# Altium PCB Membrane_Board_Latest.PcbDoc (part 3 of 4)
Units mil, origin at the board's own origin, x right, y up, seen from the top; angles counter-clockwise.
Board outline 11929.13 x 4962.8 mil, 2 copper layers (Top Layer, Bottom Layer), stack 59 mil thick; 247 components, 169 nets, 1256 pads, 657 vias.
Unrouted connection lines stored in the file: 293.
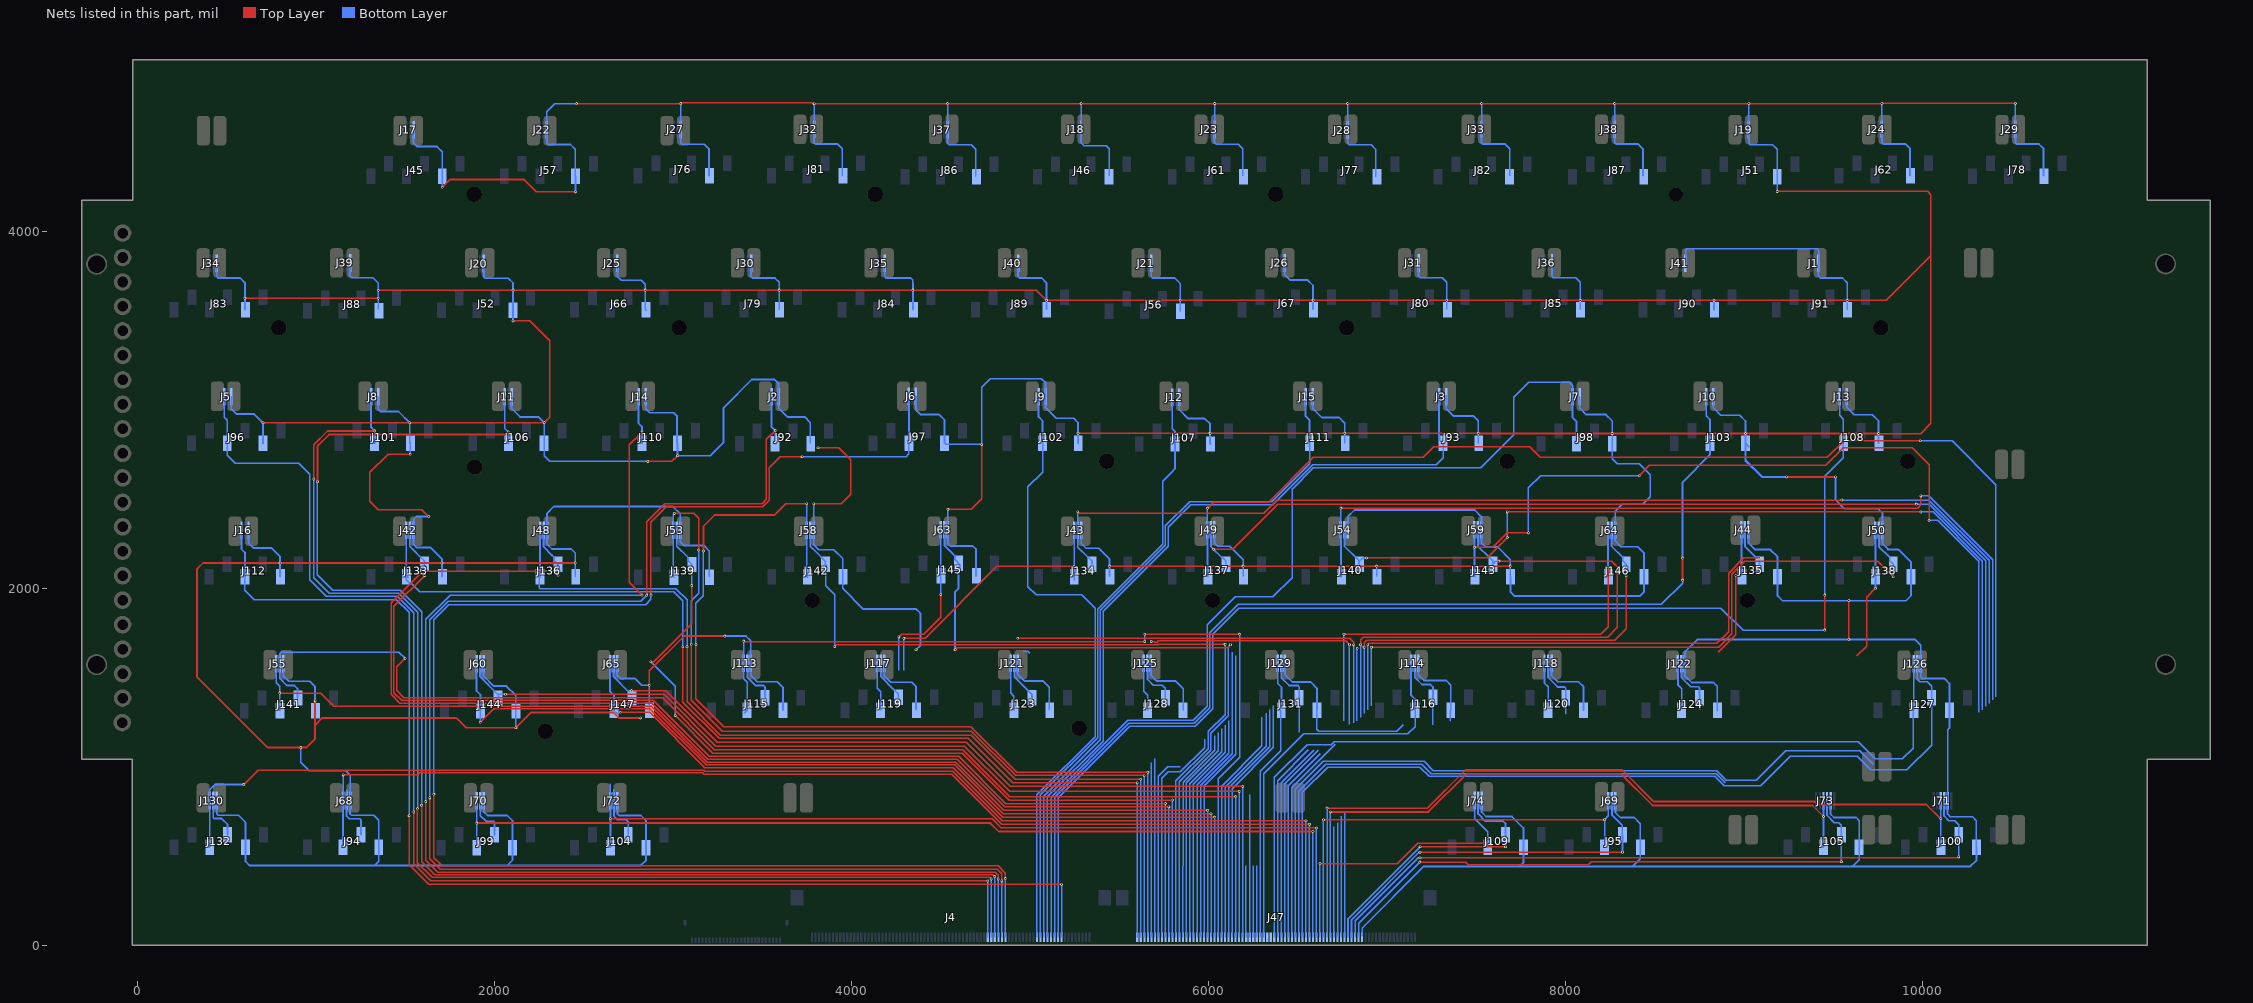
[diagram p3: the nets of this part, all layers, seen from the top]

## Via types
v1: diameter 15.75, hole 7.87, Top Layer to Bottom Layer, tented both sides, 655 vias
v2: diameter 23.62, hole 11.81, Top Layer to Bottom Layer, 2 vias

## Nets (pads, with @x,y where several pads share a name; then routed paths per layer and width w, separated by ;. In a path a pad name is that pad's centre, name@x,y a point inside that pad or via, vN(x,y) a via of type N, cw(c..) or ccw(c..) an arc to the next point about the centre after c; other vN are vias at no path point) (continued)
I2C5.SDA_27: J4.51 J5.3 J96.3 | length 7070.1
  Top Layer w8: v1@1546.23,746.9 1546.23,456.77 1643,360 v1@4761.66,360
  Bottom Layer w8: J96.3@501.73,2811.38 501.73,2744.51 546.79,2699.46 902.79,2699.46 963.79,2638.46 963.79,2047.46 1055.79,1955.46 1453.79,1955.46 1546.79,1862.46 1546.79,746.46 v1(1546.73,746.4) ; J4.51@4763,44.5 v1(4763,360)
  Bottom Layer w10: J5.3@484.73,3073.75 484.73,2958.27 501.73,2941.27 J96.3@501.73,2811.38
I2C5.SDA_28: J4.52 J8.3 J101.3 | length 7034.8
  Top Layer w8: v1@1567.29,765.96 1567.29,461.71 1649,380 4774,380 v1(4783,371)
  Top Layer w10: v1(986.79,2612.46) 986.79,2804.79 1063.46,2881.46 v1(1327.79,2881.46)
  Bottom Layer w8: v1(986.79,2612.46) 986.79,2059.46 1073.79,1972.46 1461.79,1972.46 1567.79,1866.46 v1(1567.79,765.46) ; J4.52@4782.73,44.46 v1@4782.73,371
  Bottom Layer w10: J8.3@1307.79,3073.75 1307.79,2901.46 v1(1327.79,2881.46) J101.3@1327.79,2811.38
I2C5.SDA_29: J4.53 J11.3 J106.3 | length 7748.3
  Top Layer w8: v1@1590.23,785.02 1590.23,468.77 1664,395 4791.16,395 v1(4802,384.16)
  Top Layer w10: v1(1006.79,2596.46) 1006.79,2795.79 1072.46,2861.46 2061.79,2861.46 v1(2075.79,2875.46)
  Bottom Layer w8: v1(1006.79,2596.46) 1006.79,2074.46 1092.79,1988.46 1470.79,1988.46 1590.79,1868.46 1590.79,784.58 v1(1590.73,784.52) ; J4.53@4802,44.87 v1(4802,384.16)
  Bottom Layer w10: J11.3@2056,3071.84 2056,2895.25 v1(2075.79,2875.46) 2075.79,2813.01 J106.3@2077.42,2811.38
I2C5.SDA_30: J4.54 J14.3 J110.3 | length 7481.8
  Top Layer w8: v1@1613.29,804.96 1613.29,476.71 1680,410 4805,410 4821.78,393.22 v1(4821.78,371.22) ; v1@2825.79,1962.15 2755,2032.94 2755,2804.67 v1(2825.79,2875.46)
  Bottom Layer w8: v1(1613.79,804.46) 1613.79,1825.46 1749.79,1961.46 2825.1,1961.46 v1(2825.44,1961.8) ; J4.54@4821.78,44.78 v1(4821.78,371.22)
  Bottom Layer w10: J14.3@2806.1,3073.75 2806.1,2924.9 2825.1,2905.9 ; J110.3@2825.1,2811.38 2825.1,2905.9 ; v1(2825.79,2875.46) 2825.79,2905.21 2825.1,2905.9
I2C5.SDA_31: J2.3 J4.55 J92.3 | length 8017
  Top Layer w8: v1@1636.29,825.96 1636.29,484.71 1696,425 4816.22,425 4841.78,399.44 v1(4841.78,360.22) ; v1(2851.79,1961.46) 2851.79,2373.79 2952.46,2474.46 3499.25,2474.46 3523,2498.21 3523,2834.67 v1(3571.79,2883.46)
  Bottom Layer w8: v1(1636.79,825.46) 1636.79,1824.71 1739.54,1927.46 2817.79,1927.46 v1(2851.79,1961.46) ; J4.55@4841.78,44.46 v1(4841.78,360.22)
  Bottom Layer w10: J2.3@3552,3070.76 3552,2903.25 v1(3571.79,2883.46) ; J92.3@3571.1,2810.38 v1@3571.1,2883.46
I2C5.SDA_32: J4.56 J6.3 J97.3 | length 8658.8
  Top Layer w8: v1(1659.79,845.46) 1659.79,490.21 1706,444 4821,444 4861,404 v1(4861,373) ; v1(2875.79,1961.46) 2875.79,2370.79 2962,2457 3503,2457 3538,2492 3538,2675.67 3599.79,2737.46 v1(3722.79,2737.46)
  Bottom Layer w8: v1(1659.79,845.46) 1659.79,1824.46 1743.79,1908.46 2846.46,1908.46 2875.79,1937.79 v1(2875.79,1961.46) ; v1(3722.79,2737.46) 4304.93,2737.46 4321.1,2753.63 J97.3@4321.1,2812.38 ; J4.56@4861,44.93 v1(4861,373)
  Bottom Layer w10: J97.3@4321.1,2812.38 J6.3@4321.1,3074.75
I2C5.SDA_33: J4.65 J9.3 J102.3 | length 3513.2
  Bottom Layer w8: J4.65@5038.63,44.46 5038.63,843.3 5364,1168.67 5364,1887.25 5288.79,1962.46 5033.79,1962.46 4986.79,2009.46 4986.79,2568.46 5069.79,2651.46 J102.3@5069.79,2811.38
  Bottom Layer w10: J9.3@5047.79,3073.75 5047.79,2960.21 5069.79,2938.21 J102.3@5069.79,2811.38
I2C5.SDA_34: J4.66 J12.3 J107.3 | length 3344.6
  Bottom Layer w8: J4.66@5058.32,44.46 5058.32,453 5058.32,841.77 5379,1162.46 5379,1883.64 5743,2247.64 5743,2600.67 5799.29,2656.96 ; J12.3@5796.79,3070.75 5796.79,2894 5811.79,2879
  Bottom Layer w10: 5799.29,2656.96 5811.79,2669.46 J107.3@5811.79,2808.38 5811.79,2879
I2C5.SDA_35: J4.67 J15.3 J111.3 | length 3924.9
  Bottom Layer w8: J4.67@5078,44.46 5078,453 5078,835.67 5394,1151.67 5394,1877.43 5758,2241.43 5758,2350 5893.46,2485.46 6354.79,2485.46 6565.79,2696.46 J111.3@6565.79,2792.46
  Bottom Layer w10: J15.3@6544.1,3073.75 6544.1,2963.9 6566.1,2941.9 J111.3@6566.1,2811.38 J111.3@6566.1,2792.46
I2C5.SDA_36: J3.3 J4.68 J93.3 | length 4631.7
  Bottom Layer w8: J4.68@5097.69,44.46 5097.69,832.36 5409,1143.67 5409,1871.21 5773,2235.21 5773,2341 5900.46,2468.46 6359.79,2468.46 6583.33,2692 7275,2692 7314.16,2731.16 J93.3@7314.16,2811.38
  Bottom Layer w10: J3.3@7292,3074.65 7292,2855.54 7294.16,2853.39 7294.16,2831.38 J93.3@7314.16,2811.38
I2C5.SDA_37: J4.69 J7.3 J98.3 | length 5693.2
  Bottom Layer w8: J4.69@5117.37,44.46 5117.37,830.04 5547.08,1259.75 5913.08,1259.75 5992.79,1339.46 5992.79,1794.79 6149.46,1951.46 6359.79,1951.46 6468,2059.67 6468,2555.46 6586.54,2674 7525,2674 7711,2860 7711,3071 7793,3153 8021.83,3153 8040.16,3134.67 J7.3@8040.16,3072.75
  Bottom Layer w10: J7.3@8040,3073.61 8040,2955 8062.16,2932.84 J98.3@8062.16,2810.38
I2C5.SDA_38: J4.70 J10.3 J103.3 | length 6162.8
  Top Layer w10: v1(8656,2046) v1(8656,2169)
  Bottom Layer w8: J4.70@5137.06,44.46 5137.06,827.73 5553.79,1244.46 5920.79,1244.46 6007.79,1331.46 6007.79,1751.46 6166.79,1910.46 8537.46,1910.46 8656,2029 v1(8656,2046) 8656,2055
  Bottom Layer w10: 8656,2178 8656,2594.27 8809.47,2747.74 J103.3@8809.47,2811.38 8809.47,2945.53 8788.47,2966.53 J10.3@8788.47,3073.75
I2C5.SDA_39: J4.71 J13.3 J108.3 | length 7173.6
  Top Layer w8: v1(9452.79,1765.46) v1(9452.79,1961.46)
  Bottom Layer w8: J4.71@5156.74,44.46 5156.74,825.41 5558.79,1227.46 5925.79,1227.46 6022.79,1324.46 6022.79,1742.46 6169.79,1889.46 8870.79,1889.46 8994.79,1765.46 v1(9452.79,1765.46) ; v1(9452.79,1961.46) 9452.79,2627.79 9556.79,2731.79 J108.3@9556.79,2811.38 ; J13.3@9536.79,3073.75 9536.79,2968.21 9556.79,2948.21 9556.79,2927
  Bottom Layer w10: J108.3@9556.79,2811.38 9556.79,2927
I2C5.SDA_40: J4.72 J16.3 J112.3 | length 6728.8
  Top Layer w8: v1@1520.07,725.47 1520.07,450.93 1630,341 v1@5175.66,341
  Bottom Layer w8: J112.3@600.42,2063.38 600.42,1988.83 652.79,1936.46 1449.79,1936.46 1520.6,1865.65 v1(1520.57,724.97) ; J4.72@5176.43,44.46 v1@5176.43,341
  Bottom Layer w10: J16.3@581.42,2325.75 581.42,2219.58 600.42,2200.58 J112.3@600.42,2063.38
  other v1: 5176,341
I2C_2.SCL_66: J47.58 J68.4 J94.4 | length 963.7
  Bottom Layer w8: J68.4@1170.42,810.75 1170.76,811.09 1170.76,871.24 1171.1,871.58 ; 6722.79,687.46 6722.79,74.1 6722.84,74.05 J47.58@6722.84,44.46
  Bottom Layer w10: J68.4@1170.42,810.75 1170.42,723.83 1185.5,708.75 1244.88,708.75 1250.73,702.89 J94.4@1250.73,619.25
I2C_2.SCL_67: J47.59 J70.4 J99.4 | length 925.8
  Bottom Layer w8: J47.59@6742.52,44.46 6742.52,445.46 6742.79,445.73 6742.79,721.46
  Bottom Layer w10: J70.4@1919.47,809.75 1919.63,809.59 1919.63,726.62 ; 1919.79,726.46 1952.79,693.46 1993.93,693.46 1999.79,687.6 J99.4@1999.79,618.25
I2C_2.SCL_68: J47.60 J72.4 J104.4 | length 1021.4
  Bottom Layer w8: J72.4@2668.1,809.75 2668.1,875.14 ; J47.60@6762.21,44.46 6762.21,747.46
  Bottom Layer w10: J72.4@2668.79,809.75 2668.79,722.46 2686.25,705 2735,705 2748.42,691.58 J104.4@2748.42,618.25
I2C_2.SCL_69: J47.61 J74.4 J109.4 | length 1534.4
  Top Layer w10: v1(7185.53,551.47) v1(7664.47,551.47)
  Bottom Layer w10: J47.61@6781.89,44.46 6781.89,147.84 v1(7185.53,551.47) ; J74.4@7510.16,810.75 7510.16,735.93 7550.63,695.46 7649.79,695.46 7664.47,680.77 J109.4@7664.47,619.25 v1(7664.47,551.47)
I2C_2.SCL_70: J47.62 J69.4 J95.4 | length 2089.4
  Top Layer w10: v1(7185,520.5) 7185.4,520.9 v1@8319.42,520.9
  Bottom Layer w10: J47.62@6801.58,44.46 6801.58,142.58 7178.4,519.4 7186.56,519.4 v1@7187.66,520.5 ; J69.4@8260.1,809.75 8259.95,809.59 8259.95,730.05 8318.3,671.7 8318.3,620.36 J95.4@8319.42,619.25 v1(8319.42,520.42)
I2C_2.SCL_71: J47.63 J71.4 J100.4 | length 3992.5
  Top Layer w8: v1(7185,490) 10196.9,490 10201.9,495 v1(10204,495)
  Bottom Layer w8: J47.63@6821.26,44.46 6821.26,137.26 7174,490 v1(7185,490) ; 10147.42,697.83 10181.17,697.83 10203.79,675.21 J100.4@10203.79,619.25 ; v1(10204,495) J100.4@10204,619.04
  Bottom Layer w10: J71.4@10121.47,810.12 10121.47,723.77 10147.42,697.83
I2C_2.SCL_72: J47.64 J73.4 J105.4 | length 3329.4
  Top Layer w8: v1(7183.7,465.79) 7440.31,465.79 7445,461.1 7445,461 7456,450 8127.3,450 8144.51,467.21 v1(9545.79,467.21)
  Bottom Layer w8: J47.64@6840.95,44.46 6840.95,123.04 v1(7183.7,465.79) ; 9531.38,686.62 9545.79,672.21 J105.4@9545.79,619.25 v1(9545.79,467.21)
  Bottom Layer w10: J73.4@9465.47,809.75 9465.47,727.77 9506.62,686.62 9531.38,686.62
I2C_2.SDA_66: J47.50 J68.3 J94.3 | length 6576.6
  Top Layer w8: v1(1151.79,954.13) 1568.85,954.13 1580.48,965.75 3165.25,965.75 3172,959 4560,959 4841,678 v1(6565,678)
  Bottom Layer w8: J68.3@1150.73,810.75 1150.73,953.07 v1(1151.79,954.13) ; J47.50@6565,44.81 v1(6565,678)
  Bottom Layer w10: J94.3@1150.73,548.38 J68.3@1150.73,810.75
I2C_2.SDA_67: J47.51 J70.3 J99.3 | length 5559.8
  Top Layer w10: v1(1899.75,684.25) 4777.75,684.25 4825,637 v1(6585,637)
  Bottom Layer w8: 6585,602 v1(6585,637) ; J47.51@6585.02,44.48 6585.02,601.98
  Bottom Layer w10: J99.3@1899.79,547.38 J70.3@1899.79,809.75
I2C_2.SDA_68: J47.52 J72.3 J104.3 | length 4941.4
  Top Layer w8: 4839,657 v1(6605,657)
  Top Layer w10: v1(2648,709) 4787,709 4839,657
  Bottom Layer w8: J72.3@2648.26,815.88 2648.26,905.93 ; J47.52@6604.73,44.46 6604.73,445.46 ; 6604.76,445.49 v1@6604.76,657
  Bottom Layer w10: J104.3@2648.42,550.46 J72.3@2648.42,809.75 J72.3@2649.1,810.44
I2C_2.SDA_69: J47.53 J74.3 J109.3 | length 1712
  Top Layer w8: v1(6624.41,457.46) 7057.46,457.46 7172,572 7540,572 7564.47,596.47 v1(7564.47,604.77)
  Bottom Layer w8: J47.53@6624.41,44.46 v1(6624.41,457.46) ; J74.3@7490.47,810.75 7490.47,709.77 7564.47,635.77 v1(7564.47,604.77) J109.3@7564.47,548.38
I2C_2.SDA_70: J47.54 J69.3 J95.3 | length 2503.4
  Top Layer w8: v1(6644,703) v1(8219,703)
  Bottom Layer w8: v1(6644,703) 6644.05,702.95 6644.05,44.51 J47.54@6644.1,44.46 ; J95.3@8219,548.8 v1(8219,703) 8240.42,724.42 J69.3@8240.42,809.75
I2C_2.SDA_71: J47.55 J71.3 J100.3 | length 4609.8
  Top Layer w10: v1(6664,768) 7226,768 7440,982 8318,982 8495,805 9396,805 9413,788 10023.08,788 v1(10102.37,708.71)
  Bottom Layer w8: J47.55@6664,44.68 v1(6664,768)
  Bottom Layer w10: J100.3@10102.16,551.2 J71.3@10102.16,797.46
I2C_2.SDA_72: J47.56 J73.3 J105.3 | length 3912.4
  Top Layer w10: v1(6683,747) 7232,747 7446,961 8310,961 8488,783 9384,783 v1(9446,721)
  Bottom Layer w8: J47.56@6683,44.92 v1(6683,747)
  Bottom Layer w10: J105.3@9445.79,550.46 J73.3@9445.79,809.75
I2C_3.SCL_56: J47.32 J113.4 J115.4 | length 662.6
  Bottom Layer w8: 6209.91,446.58 6209.91,75.17 6211.03,74.05 J47.32@6211.03,44.46
  Bottom Layer w10: J113.4@3414.79,1578.75 3414.79,1501.21 3460,1456 3506,1456 3515.1,1446.9 J115.4@3515.1,1387.25
I2C_3.SCL_57: J47.41 J117.4 J119.4 | length 1739.4
  Bottom Layer w8: J119.4@4261.47,1389.88 J119.4@4263.1,1388.25 ; J47.41@6388.19,44.46 6388.19,922.86 6559.79,1094.46 ; 6831.79,1257.46 6831.79,1662.46 v1(6832.79,1663.46)
  Bottom Layer w10: J117.4@4162.79,1558.21 4162.79,1506.21 4242.45,1426.55 4243.1,1426.55 4261.47,1408.18 J119.4@4261.47,1389.88
I2C_3.SCL_58: J47.42 J121.4 J123.4 | length 3701.4
  Top Layer w8: v1(4930.79,1720.46) 5634.22,1720.46 5634.97,1721.21 6790.04,1721.21 6812.79,1698.46 v1(6812.79,1682.46)
  Bottom Layer w8: J47.42@6407.88,44.46 6407.88,911.55 6589.79,1093.46 ; 6812.79,1246.46 v1(6812.79,1682.46)
  Bottom Layer w10: J121.4@4910,1579 4911.1,1577.9 4911.1,1504.87 5010.42,1405.55 J123.4@5010.42,1387.25
I2C_3.SCL_59: J47.43 J125.4 J128.4 | length 2960
  Top Layer w8: v1(5678.79,1702.33) 5680.27,1700.85 5698.37,1700.85 5700.76,1698.46 5712.79,1698.46 5719.08,1704.75 6768.5,1704.75 v1(6789.79,1683.46)
  Bottom Layer w8: 5690,1457 5741,1457 5758.1,1439.9 J128.4@5758.1,1387.25 ; J47.43@6427.56,44.46 6427.56,905.02 6616,1093.46 ; 6789.79,1238.21 v1(6789.79,1683.46)
  Bottom Layer w10: J125.4@5657.79,1578.75 5657.79,1489.21 5690,1457 ; v1@5678.29,1701.83 v1(5678.79,1702.33)
I2C_3.SCL_60: J47.44 J129.4 J131.4 | length 1550.8
  Bottom Layer w8: J47.44@6447.25,44.46 6447.25,893.92 6624.79,1071.46 ; 6507.42,1193.16 J131.4@6507.42,1387.25
  Bottom Layer w10: J129.4@6408,1573.65 6408,1499 6451,1456 6499,1456 6508,1447 6508,1387.83 J131.4@6507.42,1387.25
I2C_3.SCL_61: J47.45 J114.4 J116.4 | length 1601.8
  Bottom Layer w8: J47.45@6466.93,44.46 6466.93,881.6 6710.33,1125 ; 7256.79,1235.46 J116.4@7256.79,1387.93
  Bottom Layer w10: J114.4@7155,1586 7155,1502 7196,1461 7243,1461 7257,1447 7257,1388.14 J116.4@7256.79,1387.93
I2C_3.SCL_62: J47.46 J118.4 J120.4 | length 4619.4
  Bottom Layer w8: J47.46@6486.62,44.46 6486.62,873.29 6642.79,1029.46 7207.79,1029.46 7259.79,977.46 8849,977.46 8902,924.46 9069.79,924.46 9234.79,1089.46 9647.58,1089.46 9723.58,1013.46
  Bottom Layer w10: J118.4@7902.16,1578.75 7902.16,1500.84 7956,1447 7995.62,1447 8001.47,1441.14 J120.4@8001.47,1387.25 8001.47,1297.46
I2C_3.SCL_63: J47.47 J122.4 J124.4 | length 3640.7
  Bottom Layer w8: J47.47@6506.3,44.46 6506.3,863.97 6656.79,1014.46 7194.79,1014.46 7248.79,960.46 8844.79,960.46 8895.79,909.46 ; J124.4@8750.79,1386.25 8751.79,1385.25 8751.79,1321.46
  Bottom Layer w10: J122.4@8650,1579.98 8650,1499 8701,1448 8744,1448 8750.79,1441.21 J124.4@8750.79,1386.25
I2C_3.SCL_64: J47.48 J126.4 J127.4 | length 5111.3
  Bottom Layer w8: J47.48@6525.99,44.46 6525.99,856.66 6667.79,998.46 7183.79,998.46 7236.79,945.46 8837.79,945.46 8888.79,894.46 9093.79,894.46 9258.79,1059.46 9633.79,1059.46 9710.18,983.07 9913.4,983.07 10051.73,1121.4 J127.4@10051.73,1386.25
  Bottom Layer w10: J126.4@9971.42,1577.75 9971.42,1489.58 9985.07,1475.93 10027.07,1475.93 10051.73,1451.27 J127.4@10051.73,1386.25
I2C_3.SCL_65: J47.57 J130.4 J132.4 | length 869
  Bottom Layer w8: 6702.79,664.46 6702.79,74.41 6703.15,74.05 J47.57@6703.15,44.46
  Bottom Layer w10: J130.4@423.47,810.75 423.47,715.61 429.33,709.75 470.5,709.75 503.79,676.46 J132.4@503.79,619.25
I2C_3.SDA_56: J47.24 J113.3 J115.3 | length 4989
  Top Layer w8: v1(3396,1703.87) 3397.48,1702.39 3402.96,1702.39 3403.77,1701.58 5642.04,1701.58 v1(5642.79,1702.33) ; v1(5642.79,1742.46) 6172.79,1742.46 v1(6173.79,1743.46)
  Bottom Layer w8: v1(3396,1703.87) 3395.55,1703.43 3395.55,1579.2 J113.3@3395.1,1578.75 3395.1,1493.9 3415.1,1473.9 3415.1,1447.57 ; J115.3@3397.79,1299.06 J115.3@3415.1,1316.38 ; v1(5642.79,1702.33) v1(5642.79,1742.46) ; J47.24@6053.55,44.46 6053.55,445.46 6053.69,445.61 6053.69,932.36 6173.79,1052.46 v1(6173.79,1743.46)
  Bottom Layer w10: J115.3@3415.1,1316.38 3415.1,1447.57
I2C_3.SDA_57: J47.33 J117.3 J119.3 | length 1068.7
  Bottom Layer w8: J117.3@4143.1,1579.75 4143.1,1440.9 4163,1421 4163,1317.48 J119.3@4163.1,1317.38 ; J47.33@6230.71,44.46 6230.71,445.46 6230.75,445.5 6230.75,842.46
I2C_3.SDA_58: J47.34 J121.3 J123.3 | length 671.7
  Bottom Layer w8: J121.3@4891.42,1578.75 4891.42,1413.58 4909,1396 4909,1317.8 J123.3@4910.42,1316.38 ; 6250.09,445.76 6250.09,74.35 6250.4,74.05 J47.34@6250.4,44.46
I2C_3.SDA_59: J47.35 J125.3 J128.3 | length 671.9
  Bottom Layer w8: J125.3@5638.1,1578.75 5638.1,1421.9 5658.1,1401.9 J128.3@5658.1,1316.38 ; 6269.94,445.6 6269.94,74.19 6270.08,74.05 J47.35@6270.08,44.46
I2C_3.SDA_60: J47.36 J129.3 J131.3 | length 1569.9
  Bottom Layer w8: J47.36@6289.77,44.46 6289.77,975.43 6404.24,1089.9 6404.24,1313.2 J131.3@6407.42,1316.38
  Bottom Layer w10: J129.3@6388.42,1578.75 6388.42,1466.58 6409,1446 J131.3@6409,1338
I2C_3.SDA_61: J47.37 J114.3 J116.3 | length 2237.4
  Bottom Layer w8: J47.37@6309.45,44.46 6309.45,961.12 6533.33,1185 7117,1185 7157.1,1225.1 J116.3@7157.1,1317.38
  Bottom Layer w10: J114.3@7135.1,1579.75 7135.1,1400.9 7157.1,1378.9 J116.3@7157.1,1317.38
I2C_3.SDA_62: J47.38 J118.3 J120.3 | length 238.2
  Bottom Layer w10: J118.3@7882,1580.51 7882,1469 7903,1448 J120.3@7903,1351
I2C_3.SDA_63: J47.39 J122.3 J124.3 | length 260.8
  Bottom Layer w10: J122.3@8630,1577.1 8630,1459 8651,1438 J124.3@8651,1325
I2C_3.SDA_64: J47.40 J126.3 J127.3 | length 5098.9
  Bottom Layer w8: J47.40@6368.51,44.46 6368.51,445.46 6368.51,940.18 6551.79,1123.46 6687.58,1123.46 6704.12,1140 9639.46,1140 9736,1043.46 9888.36,1043.46 9949.79,1104.88 9949.79,1313.43 J127.3@9951.73,1315.38
  Bottom Layer w10: J127.3@9951.73,1315.38 J126.3@9951.73,1577.75
I2C_3.SDA_65: J47.49 J130.3 J132.3 | length 7280.5
  Top Layer w8: v1(593.96,900) 674.71,980.75 3171.47,980.75 3178.21,974 4568,974 4845,697 v1(6546,697)
  Bottom Layer w8: J47.49@6546,44.79 v1(6546,697)
  Bottom Layer w10: J132.3@403.79,548.38 J130.3@403.79,810.75 403.79,871.79 432,900 v1(593.96,900)
I2C_4.SCL_41: J42.4 J47.9 J133.4 | length 6338
  Top Layer w8: v1(1607.79,2071.46) 1435.04,1898.71 1435.04,1415.21 1478.25,1372 2888.25,1372 3202.25,1058 4599.54,1058 4863.54,794 v1(5758,794)
  Bottom Layer w8: J47.9@5758,44.73 5758,786
  Bottom Layer w10: J42.4@1524.79,2325.75 1524.79,2234.87 1607.1,2152.55 J133.4@1607.1,2134.25 1607.1,2122.14 1607.79,2121.46 v1(1607.79,2071.46)
I2C_4.SCL_42: J47.10 J48.4 J136.4 | length 7160.1
  Top Layer w8: v1(2355.79,2072.46) 2332.79,2095.46 1597.79,2095.46 1420.04,1917.71 1420.04,1405.21 1468.25,1357 2880.07,1357 3195.07,1042 4591,1042 4858,775 v1(5778,775)
  Bottom Layer w8: 5777.79,767 5777.79,445.62 5777.95,445.46 J47.10@5777.95,44.46
  Bottom Layer w10: J48.4@2274.1,2325.75 2274.1,2232.9 2321,2186 2334.42,2172.58 2334.42,2154.25 J136.4@2354.42,2134.25 2354.42,2127.42 2355.79,2126.05 v1(2355.79,2072.46)
I2C_4.SCL_43: J47.11 J53.4 J139.4 | length 4977
  Top Layer w8: v1(3011.79,1287.46) 3223.27,1075.98 4620.56,1075.98 4882.96,813.58 v1(5797.58,813.58)
  Top Layer w10: v1(2875,1588) 2891,1588 3104.79,1801.79 v1(3104.79,2014.79)
  Bottom Layer w8: v1(2875,1588) 3012.29,1450.71 3012.29,1287.96 v1(3011.79,1287.46) ; J47.11@5797.58,44.52 5797.58,805.58
  Bottom Layer w10: J53.4@3020.47,2324.75 3020.47,2236.53 3084.79,2172.21 3084.79,2153.25 J139.4@3104.79,2133.25 v1(3104.79,2014.79)
I2C_4.SCL_44: J47.12 J58.4 J142.4 | length 4657.4
  Top Layer w8: v1(3906.11,1674.46) 3915.11,1683.46 5719,1683.46 5721.42,1685.87 v1(6092.79,1685.87)
  Bottom Layer w8: J142.4@3852.79,2134.25 3857.18,2129.85 3857.18,2117.43 3854.79,2115.03 3854.79,2015.46 3906.11,1964.14 v1(3906.11,1674.46) ; J47.12@5817.32,44.46 5817.32,74.05 5817.56,74.28 5817.56,920.23 5998.79,1101.46 5998.79,1198.46 6092.79,1292.46 v1(6092.79,1685.87)
  Bottom Layer w10: J58.4@3768.47,2325.75 3768.47,2236.53 3800.46,2204.54 3800.8,2204.54 3852.79,2152.55 J142.4@3852.79,2134.25
I2C_4.SCL_45: J47.13 J63.4 J145.4 | length 4025.9
  Top Layer w8: v1(4579.79,1655.46) 4591.33,1667 6106.33,1667 6123,1683.67 v1(6123,1684)
  Bottom Layer w8: J47.13@5837.01,44.46 5837.01,74.05 5837.24,74.28 5837.24,915.91 6013.79,1092.46 6013.79,1188.46 6109.79,1284.46 6109.79,1670.79 v1(6123,1684)
  Bottom Layer w10: J63.4@4519.79,2326.75 4519.79,2240.21 4579.79,2180.21 4579.79,2160.32 J145.4@4599.79,2140.32 4599.79,1999.79 4579.79,1979.79 v1(4579.79,1655.46)
I2C_4.SCL_46: J43.4 J47.14 J134.4 | length 7611.5
  Top Layer w8: v1(5266.79,2428.46) 5267.89,2428.46 5275.35,2421 6309,2421 6382.46,2494.46 v1(9548.79,2494.46)
  Bottom Layer w8: J47.14@5856.69,44.46 5856.69,445.46 5856.93,445.69 5856.93,913.6 6035.16,1091.83 6035.16,1172.46 ; v1(9548.79,2494.46) 10035.81,2494.46 10373.79,2156.48 10373.79,1356.48
  Bottom Layer w10: v1@5267.79,2428.46 5267.1,2427.77 J43.4@5267.1,2325.75 5267.1,2230.61 5325.16,2172.55 5327.42,2172.55 5347.42,2152.55 J134.4@5347.42,2134.25
I2C_4.SCL_47: J47.15 J49.4 J137.4 | length 6829
  Top Layer w8: v1(6027,2219) 6136,2219 6388.46,2471.46 v1(9965.15,2471.46)
  Bottom Layer w8: J47.15@5876.38,44.46 5876.38,910.05 6054.79,1088.46 6054.79,1191.46 ; v1(9965.15,2471.46) 10037.6,2471.46 10354.79,2154.26 10354.79,1338.46
  Bottom Layer w10: J49.4@6013.47,2326.75 6013.47,2234.08 6027,2220.56 v1(6027,2219) 6072.45,2173.55 6076.79,2173.55 6096.79,2153.55 J137.4@6096.79,2135.25
I2C_4.SCL_48: J47.16 J54.4 J140.4 | length 6120
  Top Layer w8: v1(6885,2169.87) 7560.57,2169.87 v1(7674.85,2284.15) ; v1@7674,2427.46 v1(9990.79,2427.46)
  Bottom Layer w8: J47.16@5896.06,44.46 5896.06,905.73 6074.46,1084.13 6074.46,1213.46 ; v1(7674,2428) 7674,2285 v1(7674.85,2284.15) ; v1(9990.79,2427.46) 10060.38,2427.46 10335.79,2152.05 10335.79,1320.46
  Bottom Layer w10: J54.4@6761.42,2326.75 6761.42,2236.87 6844.73,2153.55 J140.4@6844.73,2149.87 ; J140.4@6843.1,2136.88 6843.1,2148.24 J140.4@6844.73,2149.87 ; J140.4@6844.73,2135.25 J140.4@6844.73,2149.87 ; v1(6885,2169.87) 6864.73,2169.87 J140.4@6844.73,2149.87
I2C_4.SCL_49: J47.25 J59.4 J143.4 | length 4511.7
  Top Layer w8: v1(6851.79,1683.46) 6851.79,1710.46 6866.79,1725.46 8235.79,1725.46 8290.79,1780.46 8290.79,2121.21 8260,2152 v1(7627,2152)
  Bottom Layer w8: J47.25@6073.23,44.46 6073.23,891.9 6297.79,1116.46 6297.79,1277.46 ; 6851.79,1277.46 v1(6851.79,1683.46) ; J143.4@7592.73,2135.25 7609.49,2152 v1(7627,2152)
  Bottom Layer w10: J59.4@7509.42,2326.75 7509.42,2236.58 7572.45,2173.55 7572.73,2173.55 7592.73,2153.55 J143.4@7592.73,2135.25
I2C_4.SCL_50: J47.26 J64.4 J146.4 | length 3833
  Top Layer w8: v1(6871.79,1669.46) 6871.79,1694.46 6885.79,1708.46 8275.79,1708.46 8340.79,1773.46 v1(8340.79,2070.46)
  Bottom Layer w8: J47.26@6092.92,44.46 6092.92,885.58 6322.79,1115.46 6322.79,1299.46 ; 6871.79,1299.46 v1(6871.79,1669.46)
  Bottom Layer w10: J64.4@8258.1,2325.75 8258.1,2235.9 8320.42,2173.58 8320.42,2154.25 J146.4@8340.42,2134.25 ; v1(8340.79,2070.46) J146.4@8340.79,2133.88
I2C_4.SCL_51: J44.4 J47.27 J135.4 | length 4556.4
  Top Layer w8: v1@6892.07,1683.74 v1(6891.79,1683.46) 6892.35,1683.46 6900.35,1691.46 8847.79,1691.46 8913.79,1757.46 8913.79,2083.82 8999.91,2169.94 v1(9086.79,2169.94)
  Bottom Layer w8: J47.27@6112.6,44.46 6112.6,882.27 6342.79,1112.46 6342.79,1320.46 ; 6891.79,1320.46 v1(6891.79,1683.46) v1@6891.79,1683.74
  Bottom Layer w10: J44.4@9005.42,2326.75 9005.42,2234.58 9066.45,2173.55 9083.18,2173.55 v1(9086.79,2169.94) 9087.1,2169.94 J135.4@9087.1,2136.88
I2C_4.SCL_52: J47.28 J50.4 J138.4 | length 5370.6
  Top Layer w8: v1(6912.79,1669.46) 8857.79,1669.46 8932.79,1744.46 8932.79,2079.46 9004.4,2151.07 9750.93,2151.07 v1(9837,2065)
  Bottom Layer w8: J47.28@6132.29,44.46 6132.29,876.95 6363.79,1108.46 6363.79,1340.46 ; 6912.79,1340.46 v1(6912.79,1669.46)
  Bottom Layer w10: J50.4@9756.47,2325.75 9756.47,2233.53 9816.79,2173.21 9816.79,2154.25 J138.4@9836.79,2134.25 9836.79,2065.21 v1(9837,2065)
I2C_4.SCL_53: J47.29 J55.4 J141.4 | length 6969.1
  Top Layer w8: v1(1498,1607) 1450.79,1559.79 1450.79,1427.46 1491.25,1387 2941.25,1387 3231.77,1096.48 4621.52,1096.48 4885.12,832.88 v1(6151.88,832.88)
  Bottom Layer w8: v1(6151.88,832.88) 6151.88,74.14 6151.97,74.05 J47.29@6151.97,44.46
  Bottom Layer w10: J141.4@897.1,1385.25 895.3,1387.05 895.3,1437.7 878,1455 836,1455 795.79,1495.21 J55.4@795.79,1576.75 796.43,1577.39 796.43,1633.43 804.46,1641.46 1463.54,1641.46 v1(1498,1607)
I2C_4.SCL_54: J47.30 J60.4 J144.4 | length 5432.1
  Top Layer w8: 2960.21,1394.21 3239.43,1114.98 4632.02,1114.98 4885,862 v1(6172,862)
  Top Layer w10: v1(2061,1405.87) 2948.54,1405.87 2960.21,1394.21
  Bottom Layer w8: J47.30@6171.66,44.46 6171.66,445.46 6171.72,445.53 6171.72,862.39 v1@6171.79,862.46
  Bottom Layer w10: J60.4@1918.47,1576.75 1918.47,1504.24 J144.4@2017.71,1405 ; J144.4@2019.79,1384.62 2019.79,1402.92 J144.4@2017.71,1405 ; v1(2061,1405.87) 2018.59,1405.87 J144.4@2017.71,1405
I2C_4.SCL_55: J47.31 J65.4 J147.4 | length 4692.8
  Top Layer w8: v1(2767.1,1426.46) 2958.54,1426.46 3248.39,1136.61 4641.39,1136.61 4888,890 v1(6192,890)
  Bottom Layer w8: J47.31@6191.34,44.46 6191.34,445.46 6192.06,446.18 v1@6192.06,890
  Bottom Layer w10: J65.4@2666.42,1577.75 J65.4@2666.42,1576.75 2666.42,1504.61 2746.47,1424.55 2754.09,1424.55 J147.4@2756.65,1422 ; J147.4@2767.1,1387.88 J147.4@2768.73,1386.25
I2C_4.SDA_41: J42.3 J47.1 J133.3 | length 6055.3
  Top Layer w8: v1(3054,1672) 3054,1362 3257.47,1158.53 4654.47,1158.53 4903,910 v1(5601,910)
  Bottom Layer w8: J133.3@1502.31,2058.59 1505.49,2055.41 1505.49,2046.69 1528.1,2024.07 1536.83,2024.07 1579.9,1981 3003,1981 3054,1930 v1(3054,1672) ; J47.1@5600.79,44.46 5600.89,44.56 5600.89,909.89 v1(5601,910)
  Bottom Layer w10: J133.3@1502.31,2058.59 J133.3@1507.1,2063.38 ; J42.3@1505.1,2325.75 1505.1,2069.47 J133.3@1515.2,2059.37
I2C_4.SDA_42: J47.2 J48.3 J136.3 | length 5360.5
  Top Layer w8: v1(3077.75,1672) 3077.75,1363.25 3264.79,1176.21 4671.79,1176.21 4918,930 v1(5620,930)
  Bottom Layer w8: J136.3@2249.63,2058.59 2249.63,2003.14 2254.31,1998.46 3013.79,1998.46 3077.75,1934.5 v1(3077.75,1672) ; J47.2@5620.47,44.46 5620.24,44.7 5620.24,929.76 v1(5620,930) v1@5620.47,930.47
  Bottom Layer w10: J136.3@2249.63,2058.59 J136.3@2254.42,2063.38 J48.3@2254.42,2325.75
I2C_4.SDA_43: J47.3 J53.3 J139.3 | length 5156.4
  Top Layer w8: v1(3005.79,2419.46) 3115.54,2419.46 3142.79,2392.21 v1(3142.79,2214.58) ; v1(3102,1686) 3102,1372 3274.46,1199.54 4671.46,1199.54 4920,951 v1@5640.74,951
  Bottom Layer w8: v1(3102,1686) 3102,1930 3142.79,1970.79 v1(3142.79,2214.58) ; J47.3@5640.16,44.46 v1@5640.16,950.16
  Bottom Layer w10: 3000.79,2412.9 J53.3@3000.79,2324.75 3000.79,2066.38 J139.3@3004.79,2062.38
  other v1: 5640,950
I2C_4.SDA_44: J47.4 J58.3 J142.3 | length 5653.3
  Top Layer w8: v1(3128,1685) 3128,1382 3285,1225 4669,1225 4925,969 v1(5660,969)
  Top Layer w10: v1(3170,2209) 3170,2348 3232,2410 3566.89,2410 3630.35,2473.46 v1(3748.79,2473.46)
  Bottom Layer w8: v1(3128,1685) 3128,1917 3170,1959 v1(3170,2209) ; J47.4@5660,44.61 v1(5660,969)
  Bottom Layer w10: v1(3748.79,2473.46) J58.3@3748.79,2325.75 3748.79,2067.38 J142.3@3752.79,2063.38
I2C_4.SDA_45: J47.5 J63.3 J145.3 | length 1935.2
  Top Layer w8: v1(4264.79,1727.46) 4280.33,1743 4404,1743 4499.79,1838.79 v1(4499.79,1965.46)
  Bottom Layer w8: 4264.79,1539.46 v1(4264.79,1727.46) ; J47.5@5679.53,44.46 5679.53,1022.94
  Bottom Layer w10: v1(4499.79,1965.46) J145.3@4499.79,2069.46 J63.3@4499.79,2326.43
I2C_4.SDA_46: J43.3 J47.6 J134.3 | length 2582.8
  Top Layer w8: v1@4292.08,1721 4412,1721 4813.46,2122.46 v1(5247.79,2122.46)
  Bottom Layer w8: 4292.77,1539.47 v1(4292.79,1720.46) ; J134.3@5247.42,2045.07 5247.79,2045.44 J134.3@5247.79,2063.38 ; J47.6@5699.21,44.46 5699.21,1043.46
  Bottom Layer w10: J134.3@5247.42,2063.38 5247.79,2063.75 v1(5247.79,2122.46) 5247.42,2122.83 5247.42,2166.09 ; 5247.42,2166.46 J43.3@5247.42,2325.75
I2C_4.SDA_47: J47.7 J49.3 J137.3 | length 7346
  Top Layer w8: v1@5996.84,2449.46 6030.39,2483 6338,2483 6588,2733 7203,2733 7262,2792 7801,2792 7860,2733 9468,2733 9561.46,2826.46 v1(9988,2826.46)
  Bottom Layer w8: J47.7@5720,45 5718.9,46.1 5718.9,946.57 5771.79,999.46 5842.79,999.46 ; J49.3@5993.79,2326.75 v1@5993.79,2452.02 ; v1(9988,2826.46) 10166.54,2826.46 10411.79,2581.21 10411.79,1393.46
  Bottom Layer w10: J49.3@5993.79,2326.75 5993.79,2067.38 J137.3@5996.79,2064.38
  other v1: 5993.84,2449.46
I2C_4.SDA_48: J47.8 J54.3 J140.3 | length 6277.4
  Top Layer w8: v1(6741.79,2449.46) 9972.46,2449.46 9990.79,2467.79 v1(9990.79,2517.46)
  Bottom Layer w8: J47.8@5738.58,44.46 5738.58,936.25 5773.79,971.46 5842.79,971.46 5977.79,1106.46 5977.79,1155.46 ; J54.3@6741.76,2326.78 v1(6741.79,2449.46) ; v1(9990.79,2517.46) 10036.54,2517.46 10392.79,2161.21 10392.79,1376.46
  Bottom Layer w10: J54.3@6741.73,2326.75 6741.73,2067.38 J140.3@6744.73,2064.38
I2C_4.SDA_49: J47.17 J59.3 J143.3 | length 6022.7
  Top Layer w8: v1(7489.73,2229.63) 7490.04,2229.32 7593.32,2229.32 7674,2310 v1(7792.79,2310) ; v1(8413,2631) 8470,2688 9457,2688 9556,2787 9942,2787 10037,2692 v1(10037,2380)
  Bottom Layer w8: J47.17@5915.75,44.46 5915.75,902.42 6093.79,1080.46 6093.79,1232.46 ; v1(7792.79,2310) 7792.79,2562.79 7861,2631 v1(8413,2631) ; v1(10037,2380) 10086.63,2380 10314.52,2152.1 10314.52,1304.46
  Bottom Layer w10: J59.3@7489.73,2326.75 v1(7489.73,2229.63) 7489.73,2067.38 J143.3@7492.73,2064.38
I2C_4.SDA_50: J47.18 J64.3 J146.3 | length 3866.5
  Top Layer w8: v1(6759,1742.46) 8198.79,1742.46 8240.79,1784.46 v1(8240.79,2116.69)
  Bottom Layer w8: J47.18@5935.44,44.46 5935.44,898.1 6113.79,1076.46 6113.79,1258.46 ; 6759,1258.58 v1(6759,1742.46)
  Bottom Layer w10: J64.3@8238.42,2325.75 8238.42,2120.61 8240.79,2118.24 v1(8240.79,2116.69) ; J146.3@8240.42,2063.38 v1@8240.42,2116.69
I2C_4.SDA_51: J44.3 J47.19 J135.3 | length 2407.2
  Top Layer w8: 8855.97,1641.46 8953.79,1739.28 v1@8953.79,2071.1
  Bottom Layer w8: J47.19@5955.12,44.46 5955.12,74.05 5955.27,74.2 5955.27,894.94 6132.79,1072.46 6132.79,1640.46
  Bottom Layer w10: J135.3@8973.29,2064.46 8985.73,2076.9 J44.3@8985.73,2326.75
  other v1: 8954.79,2071.46
I2C_4.SDA_52: J47.20 J50.3 J138.3 | length 2399.1
  Top Layer w8: 9633.46,1622.46 9687,1676 9687,1950.67 v1(9736.79,2000.46)
  Bottom Layer w8: J47.20@5974.81,44.46 5974.81,445.46 5974.95,445.61 5974.95,892.62 6152.79,1070.46 6152.79,1622.46
  Bottom Layer w10: v1(9736.79,2000.46) 9736.9,2000.57 J50.3@9736.9,2325.63 ; v1@9738.9,2000.57 v1@9738.9,2001.9
I2C_4.SDA_53: J47.21 J55.3 J141.3 | length 6445.3
  Top Layer w8: v1(795.79,1412.58) 1025.66,1412.58 1099.04,1339.21 2876.65,1339.21 3190.85,1025 4584,1025 4853,756 v1(5995,756)
  Bottom Layer w8: J47.21@5995,44.97 5995,748
  Bottom Layer w10: J55.3@776.1,1576.75 776.1,1469.9 795.79,1450.21 v1(795.79,1412.58) 795.79,1315.69 J141.3@797.1,1314.38
I2C_4.SDA_54: J47.22 J60.3 J144.3 | length 5390
  Top Layer w8: v1(1918.79,1249.46) 1993.54,1324.21 2870.43,1324.21 2874.31,1320.33 3184.64,1010 4577,1010 4850,737 v1(6014,737)
  Bottom Layer w8: J60.3@1898.79,1559 J60.3@1898.79,1576.75 ; J47.22@6014,44.63 6014,729
  Bottom Layer w10: J60.3@1898.79,1559 1898.79,1424.56 1920.79,1402.56 J144.3@1920.79,1314.38 ; v1(1918.79,1249.46) 1918.79,1312.75 J144.3@1919.79,1313.75
I2C_4.SDA_55: J47.23 J65.3 J147.3 | length 4556.9
  Top Layer w8: v1(2703.79,1305.33) 2868.09,1305.33 3178.43,995 4569,995 4846,718 v1(6034,718)
  Bottom Layer w8: J47.23@6034,44.6 6034,710
  Bottom Layer w10: J65.3@2646.73,1577.75 J65.3@2646.73,1576.75 2646.73,1421.27 2668.73,1399.27 J147.3@2668.73,1315.38 2687.66,1296.46 2696.53,1305.33 v1(2703.79,1305.33)
OLED_RST#: J1.5 J2.5 J3.5 J5.5 J6.5 J7.5 J8.5 J9.5 J10.5 J11.5 J12.5 J13.5 J14.5 J15.5 J16.5 J17.5 J18.5 J19.5 J20.5 J21.5 J22.5 J23.5 J24.5 J25.5 J26.5 J27.5 J28.5 J29.5 J30.5 J31.5 J32.5 J33.5 J34.5 J35.5 J36.5 J37.5 J38.5 J39.5 J40.5 J41.5 J42.5 J43.5 J44.5 J45.5 J46.5 J47.65 J48.5 J49.5 J50.5 J51.5 J52.5 J53.5 J54.5 J55.5 J56.5 J57.5 J58.5 J59.5 J60.5 J61.5 J62.5 J63.5 J64.5 J65.5 J66.5 J67.5 J68.5 J69.5 J70.5 J71.5 J72.5 J73.5 J74.5 J76.5 J77.5 J78.5 J79.5 J80.5 J81.5 J82.5 J83.5 J84.5 J85.5 J86.5 J87.5 J88.5 J89.5 J90.5 J91.5 J92.5 J93.5 J94.5 J95.5 J96.5 J97.5 J98.5 J99.5 J100.5 J101.5 J102.5 J103.5 J104.5 J105.5 J106.5 J107.5 J108.5 J109.5 J110.5 J111.5 J112.5 J113.5 J114.5 J115.5 J116.5 J117.5 J118.5 J119.5 J120.5 J121.5 J122.5 J123.5 J124.5 J125.5 J126.5 J127.5 J128.5 J129.5 J130.5 J131.5 J132.5 J133.5 J134.5 J135.5 J136.5 J137.5 J138.5 J139.5 J140.5 J141.5 J142.5 J143.5 J144.5 J145.5 J146.5 J147.5 | length 89494.2
  Top Layer w8: v1(600.47,3625.46) v1(1347.79,3625.46) ; v1(701.79,2927.09) v1(1524.79,2927.09) v1(2277.42,2927.09) 2307.79,2957.46 2307.79,3386.46 2195.79,3498.46 v1(2102.79,3498.46) ; v1(1347.79,3669.69) 2101.79,3669.69 v1(2102.79,3670.69) v1(2843.79,3670.69) v1(3594.79,3670.69) v1(4342.79,3670.69) 4342.96,3670.52 5034.73,3670.52 v1(5091.79,3613.46) v1(5841.79,3613.46) v1(6585.79,3613.46) v1(7334.79,3613.46) ; v1(1526.79,2751.46) 1402.79,2751.46 1300.79,2649.46 1300.79,2488.46 1348.25,2441 1592.37,2441 v1(1631.36,2402.01) ; v1(2458.26,4715.87) 2459.67,4714.46 v1@3042.26,4714.46 ; v1(2858.33,2711) 2993,2711 v1(3025,2743) ; v1(3042.66,4715.87) 3044.76,4715.87 3048.63,4719.75 3776.61,4719.75 3780.01,4716.34 3787.51,4716.34 v1@3788.99,4714.86 ; v1(3788.16,2473.46) 3942.25,2473.46 3996,2527.21 3996,2719 3928,2787 v1(3812,2787) ; v1@3789.79,4715.86 v1(4537.79,4715.86) v1(5286.05,4715.86) 5286.18,4715.99 6034.29,4715.99 v1(6034.42,4716.13) ; v1(4539.79,2442.46) 4670.25,2442.46 4729.79,2502 v1(4729.79,2806.46) ; v1(5445.79,2124.46) v1(6193.79,2124.46) v1(6941.79,2124.46) v1(7690.79,2124.46) ; v1@6034.42,4715.86 6778.78,4715.86 v1(6779.05,4716.13) ; v1@6779.18,4715.99 7529.66,4715.99 v1(7529.79,4716.13) ; v1@7336.66,3612.59 v1(8082.47,3612.59) v1(8832,3612.59) v1(9578.79,3612.59) 9797.59,3612.59 10048,3863 ; v1@7529.92,4715.99 7530.06,4716.13 v1(8275.42,4716.13) ; v1@8275.55,4715.99 8275.69,4716.13 v1(9027.79,4716.13) ; v1@9027.92,4715.99 9028.06,4716.13 v1(9772.79,4716.13) ; v1(9186.79,4223.46) 10029.54,4223.46 10048,4205 10048,3863 ; v1(9754.79,2867.13) 9990.13,2867.13 10048,2925 10048,3863 ; v1@9772.92,4715.99 9773.43,4716.5 10520.42,4716.5 v1(10520.79,4716.87)
  Top Layer w10: v1(993.79,1368.71) 993.79,1233.46 ; v1@1706.16,4247.11 1750.05,4291 2163,4291 2232.73,4221.27 v1(2453.69,4221.27) ; v1(2451.79,2141.38) v1(1704.47,2141.38) v1(797.79,2141.38) 365.71,2141.38 332.79,2108.46 332.79,1502.21 727.54,1107.46 v1(913.79,1107.46) 943.46,1107.46 993.79,1157.79 993.79,1233.46 ; v1(2816.79,1273.46) 2696.04,1273.46 2665.04,1304.46 2204.79,1304.46 v1(2118.79,1218.46) 1840.79,1218.46 1785.79,1273.46 1033.79,1273.46 993.79,1233.46 ; v1(2866.1,1456.46) 2866.1,1537.1 3061,1732 v1(3289,1732) ; v1(5268.79,2868.13) v1(6008.79,2868.13) v1(6763.47,2868.13) v1(7511.53,2868.13) ; v1@7513.79,2867.12 v1(8262.16,2867.12) v1(9008.79,2867.13) ; v1(9008.79,2867.13) v1@9753.79,2867.13 ; v1@9239,2624 v1(9513,2624) ; v1(9587.79,1712.46) v1(9587.79,1931.46)
  Bottom Layer w8: J55.5@815.47,1571.47 J55.5@815.47,1576.75 ; v1(913.79,1107.46) 913.79,1024.21 961,977 1166,977 1190.1,952.9 J68.5@1190.1,810.75 ; v1(1526.79,2751.46) 1526.79,2810.38 J101.5@1527.79,2811.38 ; v1@1706.16,4247.11 J45.5@1706.16,4307.38 ; J106.5@2277.42,2811.38 2277.42,2742.58 2309,2711 v1(2858.33,2711) ; J22.5@2293.23,4569.75 2293.23,4670.23 2337.86,4714.86 2457.24,4714.86 v1(2458.26,4715.87) ; J27.5@3042.59,4570.81 3042.59,4715.81 v1(3042.66,4715.87) ; J58.5@3788.16,2325.75 3788.16,2469.88 v1@3791.74,2473.46 ; J32.5@3789.66,4571.88 v1@3789.66,4714.86 ; J37.5@4537.66,4568.88 v1@4537.66,4715.86 ; J63.5@4539.47,2326.75 4539.47,2442.14 v1(4539.79,2442.46) ; 4961.46,1646.46 4987.79,1646.46 4997.79,1636.46 ; J18.5@5285.92,4563.59 v1@5285.92,4715.86 ; J23.5@6034.29,4570.88 6034.29,4716 v1(6034.42,4716.13) ; J131.5@6607.42,1316.38 6607.42,1209.83 6617.25,1200 7054.33,1200 7089.79,1235.46 ; J28.5@6778.92,4576.88 6778.92,4716 v1(6779.05,4716.13) ; J33.5@7529.53,4571.75 7529.66,4571.88 7529.66,4716 v1(7529.79,4716.13) ; J98.5@8262.16,2810.38 8262.16,2725.09 8289.79,2697.46 8412.79,2697.46 8473.79,2636.46 8473.79,2511.46 8433.79,2471.46 8318.79,2471.46 8279.79,2432.46 J64.5@8279.79,2325.75 ; J38.5@8275.42,4569.12 v1(8275.42,4716.13) ; J41.5@8673.47,3821.75 8673.47,3894.14 8681.79,3902.46 9409.79,3902.46 9420.47,3891.77 J1.5@9420.47,3821.75 ; J103.5@9009.47,2811.38 J103.5@9030.47,2790.38 ; J19.5@9027.79,4569.12 v1(9027.79,4716.13) ; v1(9772.79,4716.13) 9772.84,4716.07 J24.5@9772.84,4572.75 ; v1(10520.79,4716.87) 10521.16,4716.5 J29.5@10521.16,4571.75
  Bottom Layer w10: J34.5@442.47,3821.75 442.47,3746.75 450.47,3738.75 574.47,3738.75 600.47,3712.75 v1(600.47,3625.46) J83.5@600.47,3562.01 ; J130.5@443.16,810.75 443.16,735.75 451.16,727.75 564.5,727.75 603.79,688.46 J132.5@603.79,548.38 603.79,469.46 625.79,447.46 2818.79,447.46 2848.42,477.09 J104.5@2848.42,547.38 2848.42,698.12 2819.79,726.75 2695.79,726.75 2687.79,734.75 J72.5@2687.79,809.75 ; J5.5@524.1,3073.75 524.1,3006.9 555,2976 652.82,2976 701.73,2927.09 J96.5@701.73,2811.38 ; J16.5@620.79,2325.75 620.79,2253.25 648.04,2226 749,2226 797.79,2177.21 v1(797.79,2141.38) J112.5@797.79,2066.01 ; J55.5@816,1572 815.47,1571.47 815.47,1509.53 846,1479 964,1479 993.79,1449.21 v1(993.79,1368.71) 993.79,1317.69 J141.5@997.1,1314.38 ; J68.5@1190.1,810.75 1190.1,735.75 1198.1,727.75 1322.1,727.75 1350.73,699.12 J94.5@1350.73,548.38 1350.73,470.4 1329.29,448.96 ; J39.5@1190.1,3822.75 1190.1,3747.75 1198.1,3739.75 1318.5,3739.75 1347.79,3710.46 ; J8.5@1347.16,3073.75 1347.16,3002.84 1359.25,2990.75 1461.13,2990.75 v1(1524.79,2927.09) 1524.79,2814.38 J101.5@1527.79,2811.38 ; v1(1347.79,3669.69) 1348.1,3670 1348.1,3710.46 ; J88.5@1348.1,3563.01 v1@1348.1,3669.69 ; J17.5@1545.53,4562.46 1545.53,4494.75 1565.28,4475 1677,4475 1706.16,4445.84 J45.5@1706.16,4307.38 ; v1(1631.36,2402.01) 1562.01,2402.01 1544.47,2384.47 J42.5@1544.47,2325.75 1544.47,2248.02 1564.49,2228 1642,2228 1704.47,2165.53 v1(1704.47,2141.38) J133.5@1704.47,2066.01 ; J60.5@1938.16,1576.75 1938.16,1508.59 1994.75,1452 2066,1452 2118.16,1399.84 2118.16,1313.75 2118.79,1313.12 v1(2118.79,1218.46) ; J70.5@1939.16,809.75 1939.16,748.09 1960.5,726.75 2071.16,726.75 2099.79,698.12 J99.5@2099.79,547.38 2099.79,476.46 2071.79,448.46 ; J20.5@1939.79,3819.75 1939.79,3744.75 1947.79,3736.75 2076.5,3736.75 2102.79,3710.46 v1(2102.79,3670.69) v1(2102.79,3498.46) ; J11.5@2094.79,3073.75 2094.79,3007.22 2142.01,2960 2244.51,2960 v1(2277.42,2927.09) J106.5@2277.42,2811.38 ; J22.5@2293.1,4569.75 2293.1,4494.75 2301.1,4486.75 2425.1,4486.75 2451.1,4460.75 J57.5@2451.1,4310.01 ; J136.5@2451.79,2066.01 v1(2451.79,2141.38) 2451.79,2197.46 2429.25,2220 2321.29,2220 2293.79,2247.5 J48.5@2293.79,2325.75 2293.79,2420.46 2331.79,2458.46 2998.79,2458.46 3040.16,2417.09 J53.5@3040.16,2324.75 3040.16,2259.84 3059.87,2240.13 3170.87,2240.13 3202.16,2208.84 J139.5@3202.16,2065.01 ; v1(2453.69,4221.27) J57.5@2453.73,4307.38 ; J65.5@2686.1,1577.75 J65.5@2686.1,1576.75 2686.1,1513.54 2704.89,1494.75 2785.25,1494.75 2823.54,1456.46 v1(2866.1,1456.46) J147.5@2866.1,1318.01 ; J25.5@2687.79,3821.75 2687.79,3746.75 2708.54,3726 2822,3726 2843.79,3704.21 v1(2843.79,3670.69) 2843.79,3564.01 J66.5@2848.42,3559.38 ; J14.5@2846,3070.48 2846,3055.28 2846.13,3055.14 2846.13,3004.87 2868,2983 3004.22,2983 3022.47,2964.75 J110.5@3022.47,2814.01 ; J110.5@3025,2811.28 v1(3025,2743) 3208,2743 3282.79,2817.79 3282.79,3011.46 3441.79,3170.46 3566.54,3170.46 3590.79,3146.21 3590.79,3072.75 J2.5@3591.47,3072.07 ; J27.5@3042.53,4570.75 3042.53,4495.75 3050.53,4487.75 3174.53,4487.75 3200.53,4461.75 J76.5@3200.53,4311.01 ; v1(3289,1732) 3408.35,1732 3434.47,1705.88 J113.5@3434.47,1578.75 3434.47,1513.57 3472.04,1476 3584,1476 3615.1,1444.9 J115.5@3615.1,1316.38 ; J30.5@3436.47,3821.75 3436.47,3746.75 3444.47,3738.75 3570.25,3738.75 3594.79,3714.21 3594.79,3680.58 ; J2.5@3591.47,3072.75 J2.5@3591.47,3072.07 ; J79.5@3594.47,3562.01 3594.79,3562.32 v1(3594.79,3670.69) 3594.79,3680.27 ; J92.5@3768.47,2813.01 3768.47,2928.53 3737,2960 3640,2960 3591.47,3008.53 J2.5@3591.47,3072.07 ; J58.5@3788.16,2325.75 3788.16,2244.88 3817.04,2216 3901,2216 3950.16,2166.84 3950.16,1999.09 4065.79,1883.46 4362.08,1883.46 4383.86,1861.68 4386.79,1858.75 4386.79,1681.46 v1(4360.79,1655.46) ; J32.5@3789.53,4571.75 3789.53,4496.75 3797.53,4488.75 3921.53,4488.75 3947.53,4462.75 J81.5@3947.53,4312.01 ; J117.5@4182.47,1579.75 4182.47,1510.57 4219.04,1474 4337.25,1474 4360.47,1450.77 J119.5@4360.47,1320.01 ; J35.5@4185.47,3821.75 4185.47,3746.75 4193.47,3738.75 4331.5,3738.75 4342.79,3727.46 4342.79,3710.46 ; v1(4342.79,3670.69) 4343.47,3671.37 4343.47,3710.46 ; J84.5@4343.47,3562.01 v1@4343.47,3670.69 ; J6.5@4360.47,3074.75 4360.47,2999.75 4387.22,2973 4491,2973 4521.1,2942.9 J97.5@4521.1,2812.38 4527.03,2806.46 v1(4729.79,2806.46) 4729.79,3127.46 4776.79,3174.46 5063.54,3174.46 5087.16,3150.84 J9.5@5087.16,3073.75 5087.16,3012.49 5146.65,2953 5244,2953 5268.79,2928.21 v1(5268.79,2868.13) 5268.79,2812.38 J102.5@5269.79,2811.38 ; J37.5@4537.53,4568.75 4537.53,4493.75 4545.53,4485.75 4669.53,4485.75 4695.53,4459.75 J86.5@4695.53,4309.01 ; J63.5@4539.47,2326.75 4539.47,2251.75 4554.22,2237 4678.22,2237 4697.47,2217.75 J145.5@4697.47,2067.01 ; J121.5@4930,1580 4930,1519 4968,1481 5072,1481 5107.79,1445.21 J123.5@5107.79,1319.01 ; J40.5@4932.84,3821.75 4932.84,3746.75 4940.84,3738.75 5064.84,3738.75 5091.79,3711.81 v1(5091.79,3613.46) J89.5@5091.79,3562.95 ; J18.5@5285.47,4571.75 5285.47,4496.75 5302.22,4480 5426.22,4480 5443.47,4462.75 J46.5@5443.47,4312.01 ; J43.5@5286.79,2325.75 5286.79,2250.75 5313.54,2224 5385,2224 5445.79,2163.21 v1(5445.79,2124.46) J134.5@5445.79,2067.01 ; J125.5@5677.47,1578.75 5677.47,1512.48 5709.96,1480 5816,1480 5858.1,1437.9 J128.5@5858.1,1316.38 ; J21.5@5678.79,3821.75 5678.79,3746.75 5686.79,3738.75 5810.79,3738.75 5841.79,3707.75 v1(5841.79,3613.46) J56.5@5841.79,3552.46 ; J12.5@5836.16,3070.75 5836.16,3001.67 5886.83,2951 5979,2951 6008.79,2921.21 v1(6008.79,2868.13) 6008.79,2811.38 J107.5@6011.79,2808.38 ; J49.5@6033.16,2326.75 6033.16,2254.75 6051.91,2236 6118.62,2236 6194.16,2160.46 J137.5@6194.16,2067.01 ; J23.5@6034.16,4570.75 6034.16,4495.75 6042.16,4487.75 6166.16,4487.75 6192.16,4461.75 J61.5@6192.16,4311.01 ; J26.5@6427.47,3822.75 6427.47,3756.53 6456,3728 6554,3728 6585.47,3696.53 J67.5@6585.47,3563.01 ; J129.5@6428.45,1574.75 6428.45,1516.22 6469.67,1475 6572,1475 6607.42,1439.58 J131.5@6607.42,1316.38 ; J15.5@6583.47,3073.75 6583.47,3007.57 6634.04,2957 6732,2957 6763.47,2925.53 v1(6763.47,2868.13) J111.5@6763.47,2814.01 ; J28.5@6779.53,4567.75 6779.53,4492.75 6787.53,4484.75 6911.53,4484.75 6937.53,4458.75 J77.5@6937.53,4308.01 ; J54.5@6781.1,2326.75 6781.1,2401.77 6817.79,2438.46 7492.54,2438.46 7529.1,2401.9 J59.5@7529.1,2326.75 7529.1,2254.75 7551.85,2232 7619,2232 7690.79,2160.21 v1(7690.79,2124.46) ; J47.65@6860.63,52.63 6861.54,53.54 6861.54,96.54 7206.46,441.46 7743.79,441.46 ; J140.5@6942.1,2067.01 v1@6942.1,2124.46 ; J114.5@7174.47,1579.75 7174.47,1516.53 7208,1483 7331,1483 7357.1,1456.9 J116.5@7357.1,1317.38 7354.79,1315.06 7354.79,1257.46 ; J31.5@7177.16,3822.75 7177.16,3747.75 7185.16,3739.75 7309.16,3739.75 7335.16,3713.75 J80.5@7335.16,3563.01 ; J3.5@7331,3077.82 7331.53,3077.29 J3.5@7331.53,3073.75 7331.53,3006.51 7372.04,2966 7483.66,2966 7511.53,2938.13 v1(7511.53,2868.13) J93.5@7511.53,2814.01 ; J33.5@7529.53,4571.75 7529.53,4496.75 7537.53,4488.75 7661.53,4488.75 7687.53,4462.75 J82.5@7687.53,4312.01 ; J74.5@7529.84,810.75 7529.84,746.4 7554.79,721.46 7699.79,721.46 7764.47,656.77 J109.5@7764.47,548.38 7764.47,462.14 7743.79,441.46 ; J59.5@7529.96,2327.79 J59.5@7530.99,2326.75 ; J143.5@7690.1,2067.01 v1@7690.1,2124.46 ; J143.5@7692.73,2064.38 7692.73,1978.51 7714.79,1956.46 8415.79,1956.46 8440.42,1981.09 J146.5@8440.42,2063.38 8440.42,2196.58 8404,2233 8310,2233 8277.79,2265.21 J64.5@8277.79,2325.75 ; J118.5@7922.5,1573.49 7921.84,1572.84 7921.84,1510.67 7956.52,1476 8073,1476 8101.47,1447.53 J120.5@8101.47,1316.38 ; J36.5@7924.47,3822.75 7924.47,3747.75 7932.47,3739.75 8056.47,3739.75 8082.47,3713.75 v1(8082.47,3612.59) J85.5@8082.47,3563.01 ; J7.5@8079.53,3072.75 8079.53,3010.07 8116.59,2973 8226.28,2973 8262.16,2937.12 v1(8262.16,2867.12) J98.5@8262.16,2810.38 ; J38.5@8275.79,4571.75 8275.79,4496.75 8283.79,4488.75 8407.79,4488.75 8433.79,4462.75 J87.5@8433.79,4312.01 ; J69.5@8279.79,809.75 8279.8,743.45 8307.79,715.46 8384.79,715.46 8419.42,680.83 J95.5@8419.42,548.38 8419.42,484.09 8376.79,441.46 ; J122.5@8669.16,1576.59 8669.16,1509.88 8707.04,1472 8829,1472 8850.79,1450.21 J124.5@8850.79,1315.38 ; J122.5@8669.16,1577.75 8669.16,1643.16 8738.46,1712.46 v1(9587.79,1712.46) 9958.79,1712.46 9991.1,1680.14 J126.5@9991.1,1577.75 9991.1,1502.75 9999.1,1494.75 10123.1,1494.75 10151.73,1466.12 J127.5@10151.73,1315.38 10151.73,1217.4 10141.6,1207.27 10141.6,957.6 10141.53,957.52 J71.5@10141.53,809.75 ; J10.5@8827.84,3073.75 8827.84,3013.16 8871,2970 8975.92,2970 9008.79,2937.13 ; v1@8832,3616 v1(8832,3612.59) 8832,3561.48 J90.5@8834.1,3559.38 ; 9008.79,2936.59 9009.32,2937.13 ; J103.5@9009.47,2793.07 J103.5@9009.47,2811.38 ; J44.5@9025.1,2326.75 9025.1,2254.75 9062.85,2217 9148,2217 9188.73,2176.27 J135.5@9188.73,2064.38 9188.73,1957.51 9215.79,1930.46 9907.79,1930.46 9936.79,1959.46 J138.5@9936.79,2063.38 9936.79,2145.21 9864,2218 9807.66,2218 9776.16,2249.5 J50.5@9776.16,2325.75 9776.16,2420.84 9751,2446 9563,2446 9513,2496 v1(9513,2624) ; J19.5@9028.16,4568.75 9028.16,4493.75 9036.16,4485.75 9160.16,4485.75 9186.16,4459.75 J51.5@9186.16,4309.01 ; v1(9186.79,4223.46) J51.5@9186.79,4305.75 ; J1.5@9416.47,3821.75 9416.47,3750.75 9428.47,3738.75 9552.47,3738.75 9578.47,3712.75 J91.5@9578.47,3562.01 ; J73.5@9485.16,809.75 9485.16,734.75 9504.45,715.46 9628.45,715.46 9645.79,698.12 J105.5@9645.79,548.38 9645.79,478.46 9608.79,441.46 ; J13.5@9576.16,3073.75 9576.16,3013.47 9617.63,2972 9719.92,2972 9753.79,2938.13 9754.16,2938.13 J108.5@9754.16,2814.01 ; J24.5@9772.84,4571.75 9772.84,4497.75 9780.84,4489.75 9904.84,4489.75 9930.84,4463.75 J62.5@9930.84,4313.01 ; J71.5@10141.16,810.12 10141.16,735.12 10156.82,719.46 10280.82,719.46 10301.79,698.49 J100.5@10301.79,550.83 ; J100.5@10303.79,548.38 10303.79,476.46 10268.79,441.46 9608.79,441.46 ; J29.5@10521.16,4571.75 10521.16,4496.75 10529.16,4488.75 10653.16,4488.75 10679.16,4462.75 J78.5@10679.16,4312.01 ; 7743.79,441.46 8376.79,441.46 ; 8376.79,441.46 9608.79,441.46
  Bottom Layer w12: 9008.79,2937.13 9008.79,2936.59 v1(9008.79,2867.13) 9008.79,2716.21 9101,2624 9158,2624 ; 9158.03,2624.03 v1(9238.43,2624.03)
  other v1: 1706.12,4247.11 3789.79,4714.86